# Altium PCB VA_HUB_PCB.PcbDoc (part 4 of 12)
Units mil, origin at the board's own origin, x right, y up, seen from the top; angles counter-clockwise.
Board outline 4408 x 3619 mil, 8 copper layers (Top Layer, Routing 1, Routing 2, Power Plane, GND Plane, Routing 3, Routing 4, Bottom Layer), stack 85.156 mil thick; 569 components, 440 nets, 2911 pads, 1518 vias.
Unrouted connection lines stored in the file: 46.
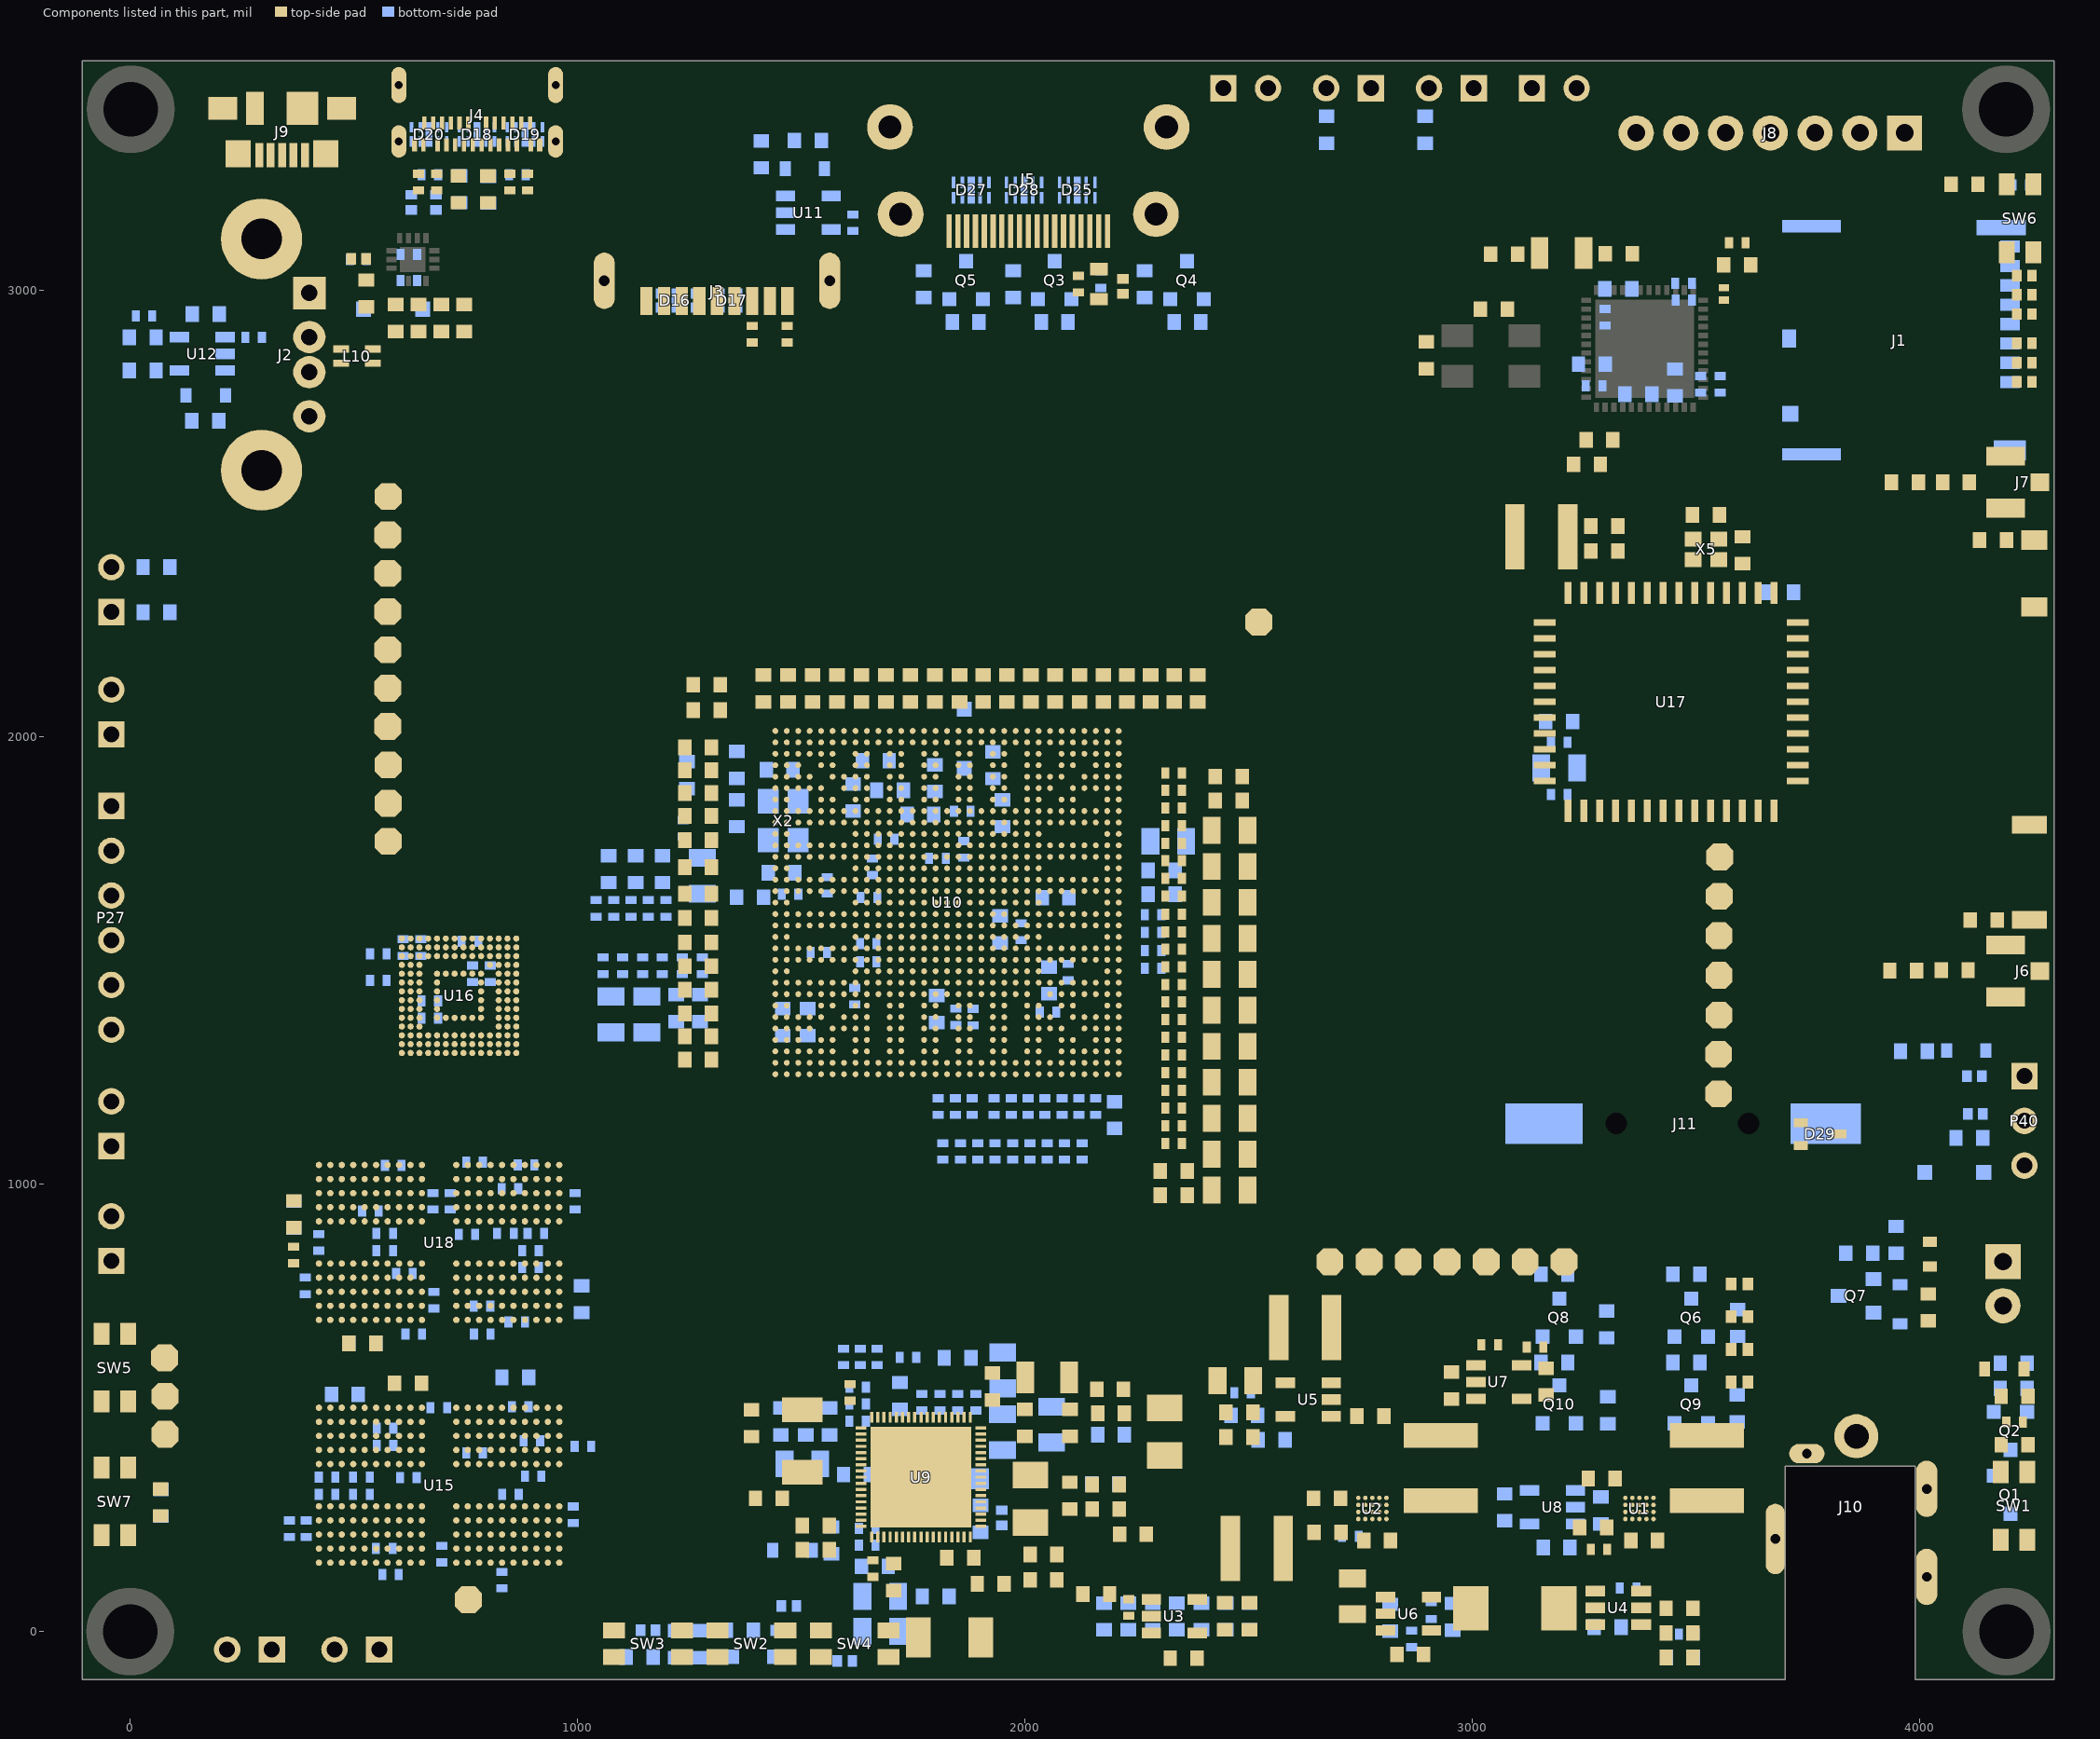
[diagram p8: the components of this part, seen from the top]

## Part data (continued)
Q2 Q6 Q8 Q9 Q10: "Trans Gp Bjt NPN 25V 1.5A 300MW 3-PIN SOT-23 T/r", Case/Package=TO-236-3, Collector Emitter Breakdown Voltage=25V, Collector Emitter Voltage (VCEO)=400mV, Manufacturer=Comchip, Manufacturer Part Number=SS8050-G, Max Collector Current=1.5A, Max Power Dissipation=300mW, Transition Frequency=100MHz, ComponentLink1Description="http://www.comchiptech.com/admin/files/product/SS8050-G RevA181526.pdf?src-supplier=Digi-Key", ComponentLink1URL="http://www.comchiptech.com/admin/files/product/SS8050-G RevA181526.pdf?src-supplier=Digi-Key", ComponentLink2Description=http://www.comchiptech.com/cms/UserFiles/SS8050-G%20RevA181526.pdf?src-supplier=Digi-Key, ComponentLink2URL=http://www.comchiptech.com/cms/UserFiles/SS8050-G%20RevA181526.pdf?src-supplier=Digi-Key, Max Breakdown Voltage=25V, Mount="Surface Mount", Packaging="Tape and Reel", Pricing 1="1=0.26480, 10=0.19960, 25=0.19760, 50=0.19590, 100=0.09990, 250=0.09890, 500=0.07670, 1000=0.05180 (USD)", RoHS=Yes, Stock 1=2514, Supplier 1="Arrow Electronics", Supplier Part Number 1=SS8050-G
Q3 Q4 Q5: "60V 500mA 690mW 2Ω@10V,500mA 2V@250uA N Channel SOT-23 MOSFETs ROHS", Manufacturer=WILLSEMI, ComponentLink1Description=LCSC, ComponentLink1URL=https://www.lcsc.com/product-detail/MOSFETs_WILLSEMI-Will-Semicon-WNM6001-3-TR_C239589.html, Manufacturer Part Number=WNM6001-3/TR
Q7: "SI2302 Series 20 3 A N-Ch Enhancement Mode Field Effect Transistor - SOT-23-3", Case/Package=SOT-23, Continuous Drain Current (ID)=3A, Drain to Source Breakdown Voltage=20V, Drain to Source Resistance=110mR, Gate to Source Voltage (Vgs)=8V, Input Capacitance=237pF, Manufacturer=MCC, Max Operating Temperature=150°C, Max Power Dissipation=1.25W, Min Operating Temperature=-55°C, Package Quantity=3000, Supplier Part Number 1=SI2302-TPMSCT-ND, Category=Transistors, ComponentLink1Description=https://datasheet.ciiva.com/935/si2302sot-23-935107.pdf?src-supplier=Digi-Key, ComponentLink1URL=https://datasheet.ciiva.com/935/si2302sot-23-935107.pdf?src-supplier=Digi-Key, ComponentLink2Description=https://datasheet.ciiva.com/935/si2302sot-23-935109.pdf?src-supplier=Digi-Key, ComponentLink2URL=https://datasheet.ciiva.com/935/si2302sot-23-935109.pdf?src-supplier=Digi-Key, ComponentLink3Description=https://datasheet.ciiva.com/935/si2302sot-23-935108.pdf?src-supplier=Digi-Key, ComponentLink3URL=https://datasheet.ciiva.com/935/si2302sot-23-935108.pdf?src-supplier=Digi-Key, Drain to Source Voltage (Vdss)=20V, Lead Free="Lead Free", Manufacturer Part Number=SI2302-TP, Mount="Surface Mount", Number of Elements=1, Number of Pins=3, Packaging="Tape and Reel", Polarity=N-CHANNEL, Power Dissipation=1.25W, Pricing 1="1=0.50000, 10=0.40300, 100=0.27460, 500=0.20592, 1000=0.15444 (USD)", Rds On Max=72mR, RoHS=Yes, RoHS Compliant=Yes, Stock 1=13753, Supplier 1=Digi-Key
R1 R9 R12 R13 R15 R19 R21 R24 R27 R32 R39 R40 R42 R44 R48 R56 R58 R59 R66 R96 R97 R98 R99 R101 R102 R104 R111 R113 R117 R118 R123 R124 R125: library part AC0603JR-0710KL, "RES SMD 10K OHM 5% 1/10W 0603", Case Code (Imperial)=0603, Case Code (Metric)=1608, Manufacturer=Yageo, Max Operating Temperature=155°C, Max Power Dissipation=100mW, Min Operating Temperature=-55°C, Package Quantity=1, Resistance=10kR, Resistor Type="Thick Film", Supplier Part Number 1=1029044, Temperature Coefficient=100ppm/°C, Tolerance=5%, Voltage Rating=50V, Case/Package=0603, Category="Chip SMD Resistors", ComponentLink1Description=https://datasheet.ciiva.com/5562/pyu-ac-51-rohs-l-2-5562553.pdf?src-supplier=Mouser, ComponentLink1URL=https://datasheet.ciiva.com/5562/pyu-ac-51-rohs-l-2-5562553.pdf?src-supplier=Mouser, Construction=Rectangular, Depth=0.8mm, Features="Moisture Resistant,Automotive AEC-Q200,Anti-Sulfur", Height=0.022inch, Lead Free="Lead Free", Length=0.063inch, Manufacturer Part Number=AC0603JR-0710KL, Military Standard=Not, Number of Terminations=2, Packaging="Tape and Reel", Power Rating=100mW, Pricing 1="5000=0.00540 (USD)", RoHS=Yes, RoHS Compliant=Yes, Series=AC, Size Code=0603, Stock 1=1533000, Supplier 1="Future Electronics", Termination=SMD/SMT, Width=0.031inch
R2 R10 R11 R30 R31 R37 R116 R120 R121 R122: library part "FRC0603J101 TS", "100mW Thick Film Resistors 50V ±5% ±100ppm/℃ -55℃~+155℃ 100Ω 0603 Chip Resistor - Surface Mount ROHS", Manufacturer=FOJAN, Manufacturer Part Number="FRC0603J101 TS"